# Altium PCB PCI Express Mini L1_V1.PCBDOC (part 7 of 9)
Units mm, origin at the board's own origin, x right, y up, seen from the top; angles counter-clockwise.
Board outline 70 x 83.2 mm, 6 copper layers (TopLayer, Layer 1, Layer 2, Layer 3, Layer 4, Bottom Layer), stack 0.914 mm thick; 442 components, 259 nets, 1412 pads, 857 vias.
Unrouted connection lines stored in the file: 2.
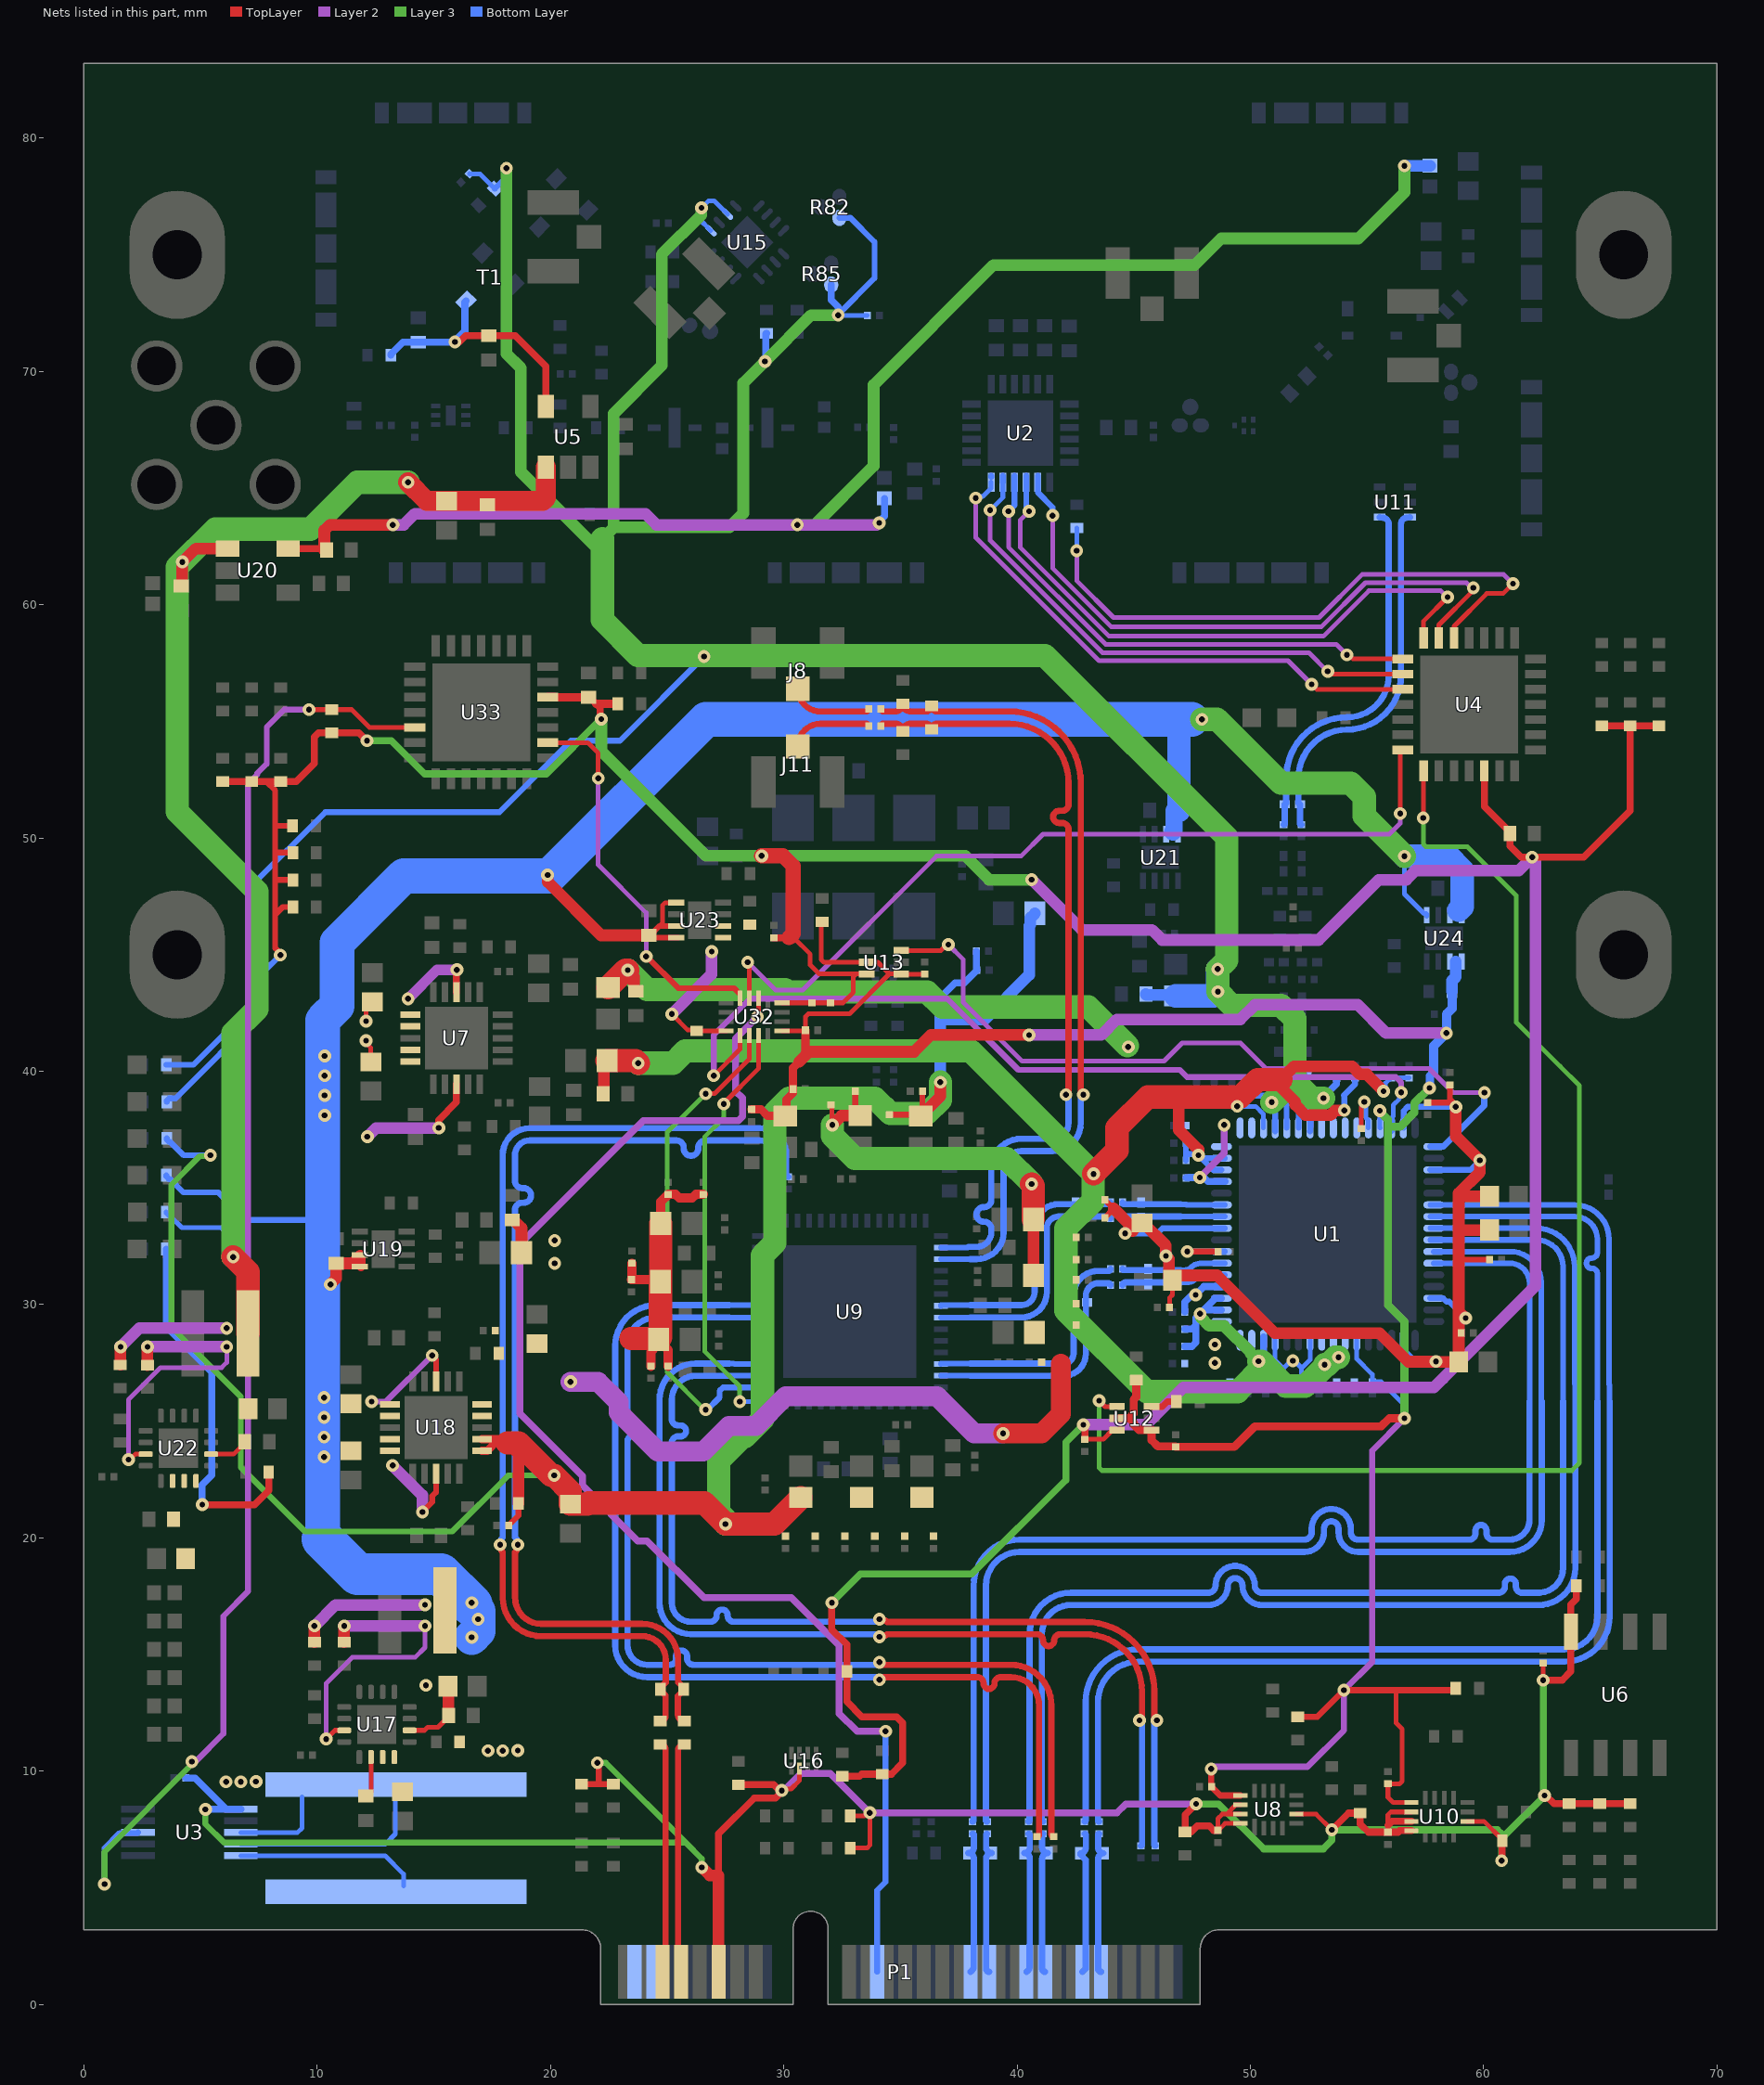
[diagram p7: the nets of this part, all layers, seen from the top]

## Via types
v1: diameter 0.55, hole 0.25, TopLayer to Bottom Layer, tented both sides, 782 vias
v2: diameter 0.55, hole 0.25, TopLayer to Bottom Layer, 40 vias
v3: diameter 0.5, hole 0.2, TopLayer to Bottom Layer, 25 vias
v4: diameter 0.35, hole 0.2, TopLayer to Bottom Layer, 10 vias

## Nets (pads, with @x,y where several pads share a name; then routed paths per layer and width w, separated by ;. In a path a pad name is that pad's centre, name@x,y a point inside that pad or via, vN(x,y) a via of type N, cw(c..) or ccw(c..) an arc to the next point about the centre after c; other vN are vias at no path point) (continued)
CMLout1_ADC_N: (continued)
  Bottom Layer w0.24: U1.22@57.708,34.275 63.897,34.275 cw(c63.897,32.801) 65.371,32.801 65.371,26.572 cw(c65.371,26.544) 65.399,26.544 65.399,25.857
  Bottom Layer w0.268: C15.1@43.516,7.841 cw(c43.516,7.893) 43.464,7.893 43.464,12.961 cw(c45.2,12.961) 45.2,14.697 63.46,14.697 ccw(c63.46,16.636) 65.399,16.636 ; 65.399,16.637 65.399,18.9 65.399,25.857
CMLout1_ADC_P: C16.1 U1.23 | length 53.6
  Bottom Layer w0.24: U1.23@57.708,33.775 63.897,33.775 cw(c63.897,32.801) 64.871,32.801 64.871,32.237 cw(c64.631,32.237) 64.631,31.997 64.622,31.997 ccw(c64.622,31.776) 64.622,31.554 64.631,31.554 cw(c64.631,31.314) 64.871,31.314 64.871,30.775 64.871,25.857
  Bottom Layer w0.268: C16.1@42.884,7.841 ccw(c42.884,7.893) 42.936,7.893 42.936,12.961 cw(c45.2,12.961) 45.2,15.225 58.304,15.225 60.731,15.225 63.46,15.225 ccw(c63.46,16.636) 64.871,16.636 64.871,25.857
CMLout1_N: C15.2 P1.44 R98.2 | length 6.3
  Bottom Layer w0.268: C15.2@43.516,7.321 ccw(c43.516,7.278) 43.473,7.278 43.473,6.721 ccw(c43.709,6.721) R98.2@43.709,6.485 ccw(c43.709,6.249) 43.473,6.249 43.473,1.527 ccw(c43.6,1.527) P1.44@43.6,1.4
CMLout1_P: C16.2 P1.42 R98.1 | length 6.2
  Bottom Layer w0.268: P1.42@42.8,1.4 42.936,1.536 42.936,2.701 42.941,2.706 42.941,6.203 42.709,6.435 R98.1@42.709,6.485 ccw(c42.709,6.721) 42.945,6.721 42.945,7.26 ccw(c42.884,7.26) C16.2@42.884,7.321
CMLout2_ADC_N: C17.1 U1.24 | length 53.9
  Bottom Layer w0.24: U1.24@57.708,33.275 62.25,33.275 cw(c62.25,31.625) 63.9,31.625 63.9,26.593 cw(c63.9,26.565) 63.928,26.565 63.928,25.857
  Bottom Layer w0.268: C17.1@41.116,7.841 cw(c41.116,7.893) 41.064,7.893 41.064,15.886 cw(c42.3,15.886) 42.3,17.122 47.796,17.122 48.194,17.122 ccw(c48.194,17.962) 49.034,17.962 cw(c49.346,17.962) 49.657,17.962 ccw(c50.497,17.962) 50.497,17.122 52.381,17.122 62.339,17.122 ccw(c62.339,18.712) 63.928,18.712 63.928,25.857
CMLout2_ADC_P: C18.1 U1.25 | length 53.9
  Bottom Layer w0.24: U1.25@57.708,32.775 62.25,32.775 cw(c62.25,31.625) 63.4,31.625 63.4,25.857
  Bottom Layer w0.268: C18.1@40.484,7.841 ccw(c40.484,7.893) 40.536,7.893 40.536,15.886 cw(c42.3,15.886) 42.3,17.65 47.796,17.65 48.194,17.65 ccw(c48.194,17.962) 48.506,17.962 cw(c49.346,17.962) 50.185,17.962 ccw(c50.497,17.962) 50.497,17.65 52.381,17.65 60.28,17.65 60.505,17.65 60.639,17.65 ccw(c60.639,17.918) 60.907,17.918 60.907,18.023 cw(c61.142,18.023) 61.378,18.023 61.378,17.918 ccw(c61.646,17.918) 61.646,17.65 62.339,17.65 ccw(c62.339,18.712) 62.462,17.657 ccw(c62.339,18.712) 63.4,18.712 63.4,25.857
CMLout2_N: C17.2 P1.38 R104.2 | length 6.3
  Bottom Layer w0.268: C17.2@41.116,7.321 ccw(c41.116,7.279) 41.074,7.279 41.074,6.729 ccw(c41.31,6.729) 41.31,6.493 ccw(c41.31,6.257) 41.074,6.257 41.074,1.526 ccw(c41.2,1.526) P1.38@41.2,1.4
CMLout2_P: C18.2 P1.36 R104.1 | length 6.3
  Bottom Layer w0.268: P1.36@40.4,1.4 ccw(c40.268,1.633) 40.536,1.634 40.536,2.55 cw(c40.9,2.55) 40.542,2.614 ccw(c40.278,2.661) 40.546,2.663 40.546,6.257 ccw(c40.31,6.257) R104.1@40.31,6.493 ccw(c40.31,6.729) 40.546,6.729 40.546,7.259 ccw(c40.484,7.259) C18.2@40.484,7.321
CMLout3_ADC_N: C35.1 U1.26 | length 52.7
  Bottom Layer w0.24: U1.26@57.858,32.275 61.134,32.275 cw(c61.134,30.947) 62.462,30.947 62.462,25.885
  Bottom Layer w0.268: C35.1@38.716,7.841 cw(c38.716,7.893) 38.664,7.893 38.664,17.956 cw(c40.107,17.956) 40.107,19.399 51.914,19.399 52.312,19.399 ccw(c52.312,20.239) 53.152,20.239 53.152,20.401 cw(c53.464,20.401) 53.776,20.401 53.776,20.239 ccw(c54.615,20.239) 54.615,19.399 55.708,19.399 61.109,19.399 ccw(c61.109,20.78) 62.49,20.78 62.49,25.857
CMLout3_ADC_P: C36.1 U1.27 | length 52.8
  Bottom Layer w0.24: U1.27@57.858,31.775 61.106,31.775 cw(c61.106,30.919) 61.962,30.919 61.962,25.885
  Bottom Layer w0.268: C36.1@38.084,7.841 ccw(c38.084,7.893) 38.136,7.893 38.136,17.956 cw(c40.107,17.956) 40.107,19.927 51.914,19.927 52.312,19.927 ccw(c52.312,20.239) 52.624,20.239 52.624,20.401 cw(c53.464,20.401) 54.304,20.401 54.304,20.239 ccw(c54.615,20.239) 54.615,19.927 55.708,19.927 59.245,19.927 59.379,19.927 ccw(c59.379,20.195) 59.647,20.195 59.647,20.321 cw(c59.882,20.321) 60.118,20.321 60.118,20.195 ccw(c60.386,20.195) 60.386,19.927 61.109,19.927 ccw(c61.109,20.78) 61.962,20.78 61.962,25.857
CMLout3_N: C35.2 P1.32 R105.2 | length 6.3
  Bottom Layer w0.268: C35.2@38.716,7.321 ccw(c38.716,7.28) 38.675,7.28 38.675,6.729 ccw(c38.911,6.729) 38.911,6.493 ccw(c38.911,6.257) 38.675,6.257 38.675,1.525 ccw(c38.8,1.525) P1.32@38.8,1.4
CMLout3_P: C36.2 P1.30 R105.1 | length 6.3
  Bottom Layer w0.268: P1.30@38,1.4 ccw(c37.868,1.633) 38.136,1.634 38.136,2.55 cw(c38.5,2.55) 38.142,2.616 ccw(c37.879,2.665) 38.147,2.666 38.147,6.257 ccw(c37.911,6.257) R105.1@37.911,6.493 ccw(c37.911,6.729) 38.147,6.729 38.147,7.259 ccw(c38.084,7.259) C36.2@38.084,7.321